# Altium PCB FULL_CB_REV_C.PcbDoc (part 2 of 2)
Units mm, origin at the board's own origin, x right, y up, seen from the top; angles counter-clockwise.
Board outline 86.1 x 38.5 mm, 4 copper layers (Top Layer, Signal Layer 2, Signal Layer 1, Bottom Layer), stack 1.643 mm thick; 96 components, 165 nets, 587 pads, 270 vias.
Unrouted connection lines stored in the file: 6.
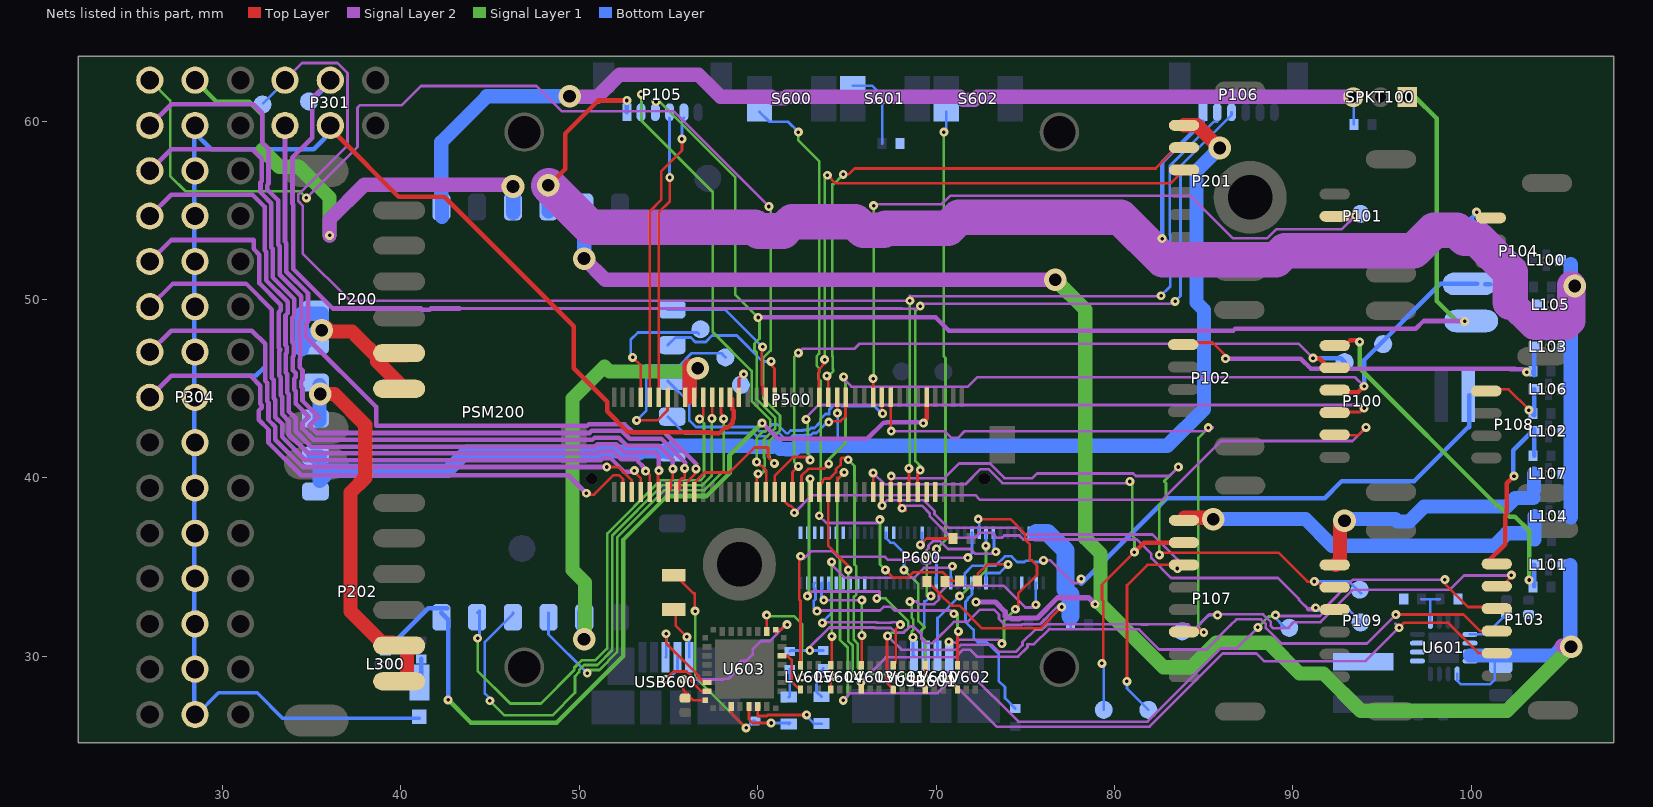
[diagram p4: the nets of this part, all layers, seen from the top]

## Via types
v1: diameter 0.5, hole 0.2, Top Layer to Bottom Layer, tented both sides, 241 vias
v2: diameter 0.5, hole 0.2, Top Layer to Bottom Layer, 15 vias
v3: diameter 1.27, hole 0.711, Top Layer to Bottom Layer, tented both sides, 14 vias

## Nets (pads, with @x,y where several pads share a name; then routed paths per layer and width w, separated by ;. In a path a pad name is that pad's centre, name@x,y a point inside that pad or via, vN(x,y) a via of type N, cw(c..) or ccw(c..) an arc to the next point about the centre after c; other vN are vias at no path point) (continued)
IO-CH2-PROT: P304.8 P500.78 | length 33
  Top Layer w0.15: v1@50.216,39.065 50.292,39.141 v1(50.394,39.141) ; v1@50.394,39.065 50.831,39.065 51.923,40.157 52.222,40.157 52.447,39.933 P500.78@52.447,39.209
  Signal Layer 2 w0.254: P304.8@25.899,44.501 27.118,45.72 31.569,45.72 32.112,45.177 32.112,44.152 32.194,44.07 32.194,43.945 32.029,43.78 32.029,43.258 32.575,42.713 32.575,41.983 34.401,40.157 49.378,40.157 v1(50.394,39.141)
IO-CH3-PROT: P304.9 P500.76 | length 34.5
  Top Layer w0.15: v1(51.537,40.615) 52.197,40.615 52.947,39.865 P500.76@52.947,39.209
  Signal Layer 2 w0.254: P304.9@25.899,47.041 27.118,48.26 31.64,48.26 32.385,47.515 32.385,45.443 32.493,45.335 32.493,44.31 32.575,44.228 32.575,43.252 32.956,42.871 32.956,42.141 34.482,40.615 v1(51.537,40.615)
IO-CH4-PROT: P304.10 P500.74 | length 37.3
  Top Layer w0.15: v1@53.061,40.361 53.447,39.975 P500.74@53.447,39.209
  Signal Layer 2 w0.254: P304.10@25.899,49.581 27.218,50.9 31.309,50.9 32.766,49.443 32.766,45.601 32.874,45.493 32.874,44.467 32.956,44.386 32.956,43.41 33.337,43.029 33.337,42.299 34.64,40.996 51.205,40.996 51.328,41.119 51.745,41.119 52.503,40.361 v1@53.061,40.361
  other v1: 53.086,40.411
IO-CH5-PROT: P304.11 P500.72 | length 40.5
  Top Layer w0.15: v1(53.721,40.386) 53.95,40.156 P500.72@53.947,39.209
  Signal Layer 2 w0.254: P304.11@25.899,52.121 27.118,53.34 31.735,53.34 31.735,52.842 32.055,52.522 32.055,50.925 33.265,49.716 33.265,49.402 33.147,49.285 33.147,47.286 33.223,47.21 33.223,47.17 33.172,47.119 33.172,45.733 33.255,45.65 33.255,44.625 33.337,44.543 33.337,43.567 33.718,43.186 33.718,42.457 34.798,41.377 51.047,41.377 51.17,41.5 51.903,41.5 52.356,41.046 53.261,41.046 53.315,40.993 53.315,40.896 53.59,40.62 53.59,40.517 v1(53.721,40.386)
IO-CH6-PROT: P304.12 P500.70 | length 43.7
  Top Layer w0.15: v1@54.412,40.386 54.412,39.244 P500.70@54.447,39.209
  Signal Layer 2 w0.254: P304.12@25.899,54.661 27.113,55.875 31.675,55.875 32.357,55.193 32.357,52.759 32.436,52.68 32.436,51.083 33.646,49.873 33.646,49.245 33.528,49.127 33.528,47.444 33.604,47.368 33.604,47.012 33.553,46.961 33.553,45.891 33.636,45.808 33.636,44.783 33.718,44.701 33.718,43.725 34.099,43.344 34.099,42.614 34.956,41.758 50.889,41.758 51.012,41.881 52.061,41.881 52.514,41.427 54.254,41.427 54.458,41.224 v1(54.458,40.411)
IO-CH7-PROT: P304.13 P500.68 | length 47.2
  Top Layer w0.15: P500.68@54.947,39.209 55.118,39.38 55.118,39.852 55.245,39.979 v1@55.245,40.557
  Signal Layer 2 w0.254: P304.13@25.899,57.201 27.118,58.42 31.655,58.42 32.194,57.881 32.194,56.645 32.126,56.577 32.126,56.01 32.738,55.398 32.738,52.916 32.817,52.838 32.817,51.241 34.027,50.031 34.027,49.087 33.909,48.969 33.909,47.602 33.985,47.525 33.985,46.854 33.934,46.804 33.934,46.049 34.099,45.884 34.099,45.654 34.017,45.572 34.017,44.941 34.099,44.859 34.099,44.171 34.831,43.439 34.48,43.088 34.48,42.772 35.113,42.139 50.731,42.139 50.854,42.262 52.219,42.262 52.672,41.808 54.447,41.808 55.245,41.01 v1(55.245,40.513)
IO-CH8-PROT: P304.14 P500.66 | length 50.3
  Top Layer w0.15: P500.66@55.447,39.209 55.618,39.38 55.618,39.852 55.736,39.97 55.844,39.97 55.905,40.031 v1(55.905,40.538)
  Signal Layer 2 w0.254: P304.14@25.899,59.741 27.118,60.96 31.715,60.96 32.233,60.442 32.233,58.801 32.575,58.459 32.575,56.487 32.507,56.419 32.507,56.168 33.119,55.556 33.119,53.074 33.198,52.995 33.198,51.399 34.408,50.189 34.408,48.929 34.29,48.811 34.29,47.759 34.366,47.683 34.366,46.697 34.315,46.646 34.315,46.206 34.48,46.042 34.48,45.496 34.398,45.414 34.398,45.099 34.48,45.017 34.48,44.329 35.4,43.409 35.339,43.409 34.861,42.93 35.271,42.52 50.574,42.52 50.697,42.643 52.377,42.643 52.83,42.189 54.605,42.189 55.931,40.863 v1@55.931,40.538
IO-SWCLK: P105.5 P500.71 | length 16.4
  Top Layer w0.152: P500.71@53.947,44.526 53.947,54.947 54.6,55.6 54.6,57.2 55.753,58.353 v1(55.753,59.004)
  Bottom Layer w0.152: v1(55.753,59.004) 55.753,60.071 P105.5@55.861,60.179
IO-SWDIO: P105.4 P500.69 | length 16.1
  Top Layer w0.152: P500.69@54.447,44.526 54.447,54.879 55.067,55.5 v1(55.067,56.845)
  Bottom Layer w0.152: P105.4@55.061,60.179 55.061,56.94 54.966,56.845 v1(55.067,56.845)
IO-USART1_RX_SPECTRUM_DSM: JP100.1 P105.3 P500.48 SPKT100.1 | length 80.6
  Top Layer w0.15: P500.48@59.947,39.209 59.947,40.16 v1(60.02,40.234)
  Signal Layer 2 w0.254: v1(60.02,48.997) 69.975,48.997 70.708,48.264 86.672,48.264 86.767,48.359 96.893,48.359 ; 96.893,48.366 97.327,48.8 v1@99.631,48.8
  Signal Layer 1 w0.15: v1@54.275,61.1 54.495,61.1 58.75,56.845 58.75,50.267 v1(60.02,48.997) ; v1(60.02,40.234) 59.995,40.259 59.995,40.005 60.353,40.363 60.353,40.664 60.396,40.707 60.396,41.081 60.353,41.124 60.353,42.151 60.978,42.776 60.978,43.38 59.949,44.409 59.949,47.031 59.822,47.158 59.822,47.533 60.096,47.807 v1@60.096,49.073
  Signal Layer 1 w0.254: SPKT100.1@96.414,61.347 96.87,61.347 98.064,60.154 98.064,49.917 99.202,48.779 v1(99.631,48.779)
  other v1: 54.3,61.1
IO-USART1_TX: P105.2 P500.46 | length 26.7
  Top Layer w0.15: v1(59.944,40.894) 60.152,40.686 60.207,40.686 60.472,40.421 60.472,39.235 P500.46@60.447,39.209
  Signal Layer 1 w0.15: v1(53.475,61.5) 53.475,60.025 57.48,56.02 57.48,48.188 59.659,46.009 59.659,44.307 60.701,43.266 60.701,42.891 60.436,42.626 60.318,42.626 59.944,42.252 v1(59.944,40.894)
  Bottom Layer w0.15: P105.2@53.5,60.65 v1@53.5,61.446
MSIC_SLP_CLK3: P600.7
NetC603_P$1: C603.P$1 U601.9 | length 2.5
  Bottom Layer w0.15: U601.9@99.936,31.236 100.84,31.236 C603.P$1@101.976,32.372
NetC604_P$1: C604.P$1 U603.1 U603.16 | length 10.8
  Top Layer w0.15: v1(55.829,28.702) 55.829,28.118 55.931,28.016 ; C604.P$1@55.931,27.654 55.931,28.016 ; U603.16@57.058,27.536 56.411,27.536 55.931,28.016 ; U603.1@61.008,31.336 U603.1@61.008,31.486 61.306,31.486 61.62,31.801 v1(61.646,31.775)
  Signal Layer 2 w0.15: v1(55.829,28.702) 58.035,28.702 58.071,28.738 58.349,28.738 58.806,29.195 58.806,29.473 59.071,29.738 59.349,29.738 59.715,30.104 59.715,30.383 60.194,30.861 60.681,30.861 61.62,31.801 v1(61.646,31.775)
NetC605_P$1: C605.P$1 L601.P$2 U603.19 | length 12.3
  Top Layer w0.15: L601.P$2@55.601,34.341 56.439,33.503 56.464,33.528 56.464,32.512 v1(56.49,32.537) ; U603.19@58.508,27.186 58.508,26.83 v1(59.35,25.988)
  Signal Layer 2 w0.254: v1(59.35,25.988) v1@59.404,25.933
  Signal Layer 1 w0.15: v1(56.49,32.537) 56.49,28.848 v1(59.35,25.988)
  Bottom Layer w0.15: v1(59.35,25.988) 59.734,26.372 C605.P$1@59.842,26.372
NetD101_C: D101.C L101.P$2 P100.1 | length 19.6
  Top Layer w0.254: P100.1@92.9,47.4 93.208,47.708 93.644,47.708 93.721,47.631 v1(93.746,47.631)
  Signal Layer 1 w0.254: v1(93.746,47.631) 93.746,46.154 101.418,38.482 ; 101.536,38.439 102.14,37.836 102.448,37.836 103.245,37.038 v1(103.245,34.279)
  Bottom Layer w0.254: D101.C@103.525,33.941 L101.P$2@103.525,35.135
NetD104_C: D104.C L103.P$2 P102.1 | length 21.7
  Top Layer w0.152: P102.1@84.026,47.595 85.493,47.595 86.225,46.863 v1(86.225,46.685)
  Signal Layer 2 w0.254: v1(86.225,46.685) 90.059,46.685 ; 90.065,46.692 90.442,46.692 91.001,46.133 102.458,46.133 ; 102.2,46.1 102.92,46.1 v1@103.098,45.922
  Bottom Layer w0.254: v1(103.11,45.935) D104.C@103.499,45.935 ; D104.C@103.525,45.757 103.525,46.951
NetD105_C: D105.C L104.P$2 P107.1 | length 22.1
  Top Layer w0.8: P107.1@83.926,37.776 85.457,37.776 v3(85.539,37.694)
  Bottom Layer w0.8: v3@85.361,37.719 85.387,37.694 v3(85.539,37.694) 90.706,37.694 92.2,36.2 101.3,36.2 102,36.9 103.548,36.9 ; D105.C@103.548,36.548 L104.P$2@103.548,37.863
NetD106_C: D106.C L105.P$2 P104.1 | length 9
  Top Layer w0.15: P104.1@100.861,54.566 101.388,54.566 P104.1@101.358,54.596
  Bottom Layer w0.254: v1(100.3,54.9) 100.3,54.8 100.241,54.8 99.986,54.545 102.818,51.713 102.818,50.164 103.644,49.338 ; 103.525,48.144 103.525,49.338
NetD107_C: D107.C L107.P$2 P109.1 | length 14.8
  Top Layer w0.8: P109.1@92.411,35.135 92.639,35.363 92.639,37.339 v3(92.9,37.6)
  Bottom Layer w0.8: v3@92.9,37.7 95.746,37.7 95.888,37.558 96.532,37.558 97.374,38.4 102,38.4 102.476,38.876 D107.C@103.474,38.876 ; 103.525,39.325 L107.P$2@103.525,40.232
NetD108_C: D108.C L106.P$2 P108.1 | length 4.7
  Top Layer w0.152: P108.1@100.861,45.041 100.932,44.969 102.094,44.969 v1@103.237,43.826
  Bottom Layer w0.254: v1(103.237,43.801) 103.525,43.514 L106.P$2@103.525,44.972
NetD300_CATHODE: D300.CATHODE D301.C L300.P$1 | length 3.4
  Bottom Layer w0.254: L300.P$1@39.132,28.753 40.814,28.753 D300.CATHODE@41.037,28.53 41.139,28.631 D301.C@41.139,29.853
NetL600_P$1: L600.1 U601.1 U601.2 U601.3
NetL601_P$1: L601.P$1 USB600.VBUS | length 2.8
  Top Layer w0.15: L601.P$1@55.397,32.461 55.397,31.725 v1(56.032,31.09)
  Bottom Layer w0.15: v1(56.032,31.09) 56.159,30.963 USB600.VBUS@56.159,29.947
NetLED600_A: LED600.A R607.P$1 | length 1.9
  Bottom Layer w0.15: LED600.A@63.576,27.737 63.3,28.013 63.3,28.942 R607.P$1@63.678,29.32
NetLED600_C: LED600.C U603.22 | length 4.3
  Top Layer w0.15: U603.22@60.008,27.186 60.008,26.657 60.511,26.657 60.57,26.716 v1(62.743,26.716)
  Bottom Layer w0.15: v1@62.705,26.678 63.158,26.225 LED600.C@63.576,26.225
NetLED601_A: LED601.A R608.P$1 | length 1.6
  Bottom Layer w0.15: LED601.A@61.747,27.711 61.798,27.762 R608.P$1@61.798,29.269
NetLED601_C: LED601.C U603.21 | length 3.2
  Top Layer w0.15: U603.21@59.508,27.186 59.508,26.471 59.715,26.264 v1(60.757,26.264)
  Bottom Layer w0.15: v1(60.757,26.264) 61.812,26.264 LED601.C@61.747,26.199
NetR600_P$1: R600.P$1 R603.P$2 U601.5 | length 2.3
  Bottom Layer w0.15: 97.218,33.204 97.708,33.204 97.711,33.207 ; U601.5@97.711,31.961 97.711,33.207 ; 98.242,33.204 97.713,33.204 97.711,33.207
NetR610_P$1: R610.P$1 R612.P$2 S600.A1 | length 36.2
  Top Layer w0.15: v1(67.158,34.849) 67.61,34.397 68.407,34.397 68.732,34.722 70.358,34.722 70.841,34.239 R612.P$2@71.323,34.239
  Signal Layer 2 w0.15: v1(63.449,37.88) 63.859,37.47 66.706,37.47 66.853,37.617 v1(66.853,37.668)
  Signal Layer 1 w0.15: v1(62.281,59.385) 62.281,58.928 63.449,57.76 63.449,46.969 63.302,46.822 63.302,46.295 63.449,46.148 63.449,45.927 63.429,45.907 63.429,45.533 63.531,45.431 63.531,37.961 v1(63.449,37.88) ; v1(66.853,37.668) 66.853,35.158 67.158,34.853 v1(67.158,34.849)
  Bottom Layer w0.15: S600.A1@60.1,60.528 60.659,59.969 61.697,59.969 v1(62.281,59.385)
NetR611_P$1: R611.P$1 S601.B3 | length 4.6
  Bottom Layer w0.15: S601.B3@65.332,61.99 66.407,61.99 66.988,61.409 66.988,58.75
NetU603_14: U603.14 USB600.D+ | length 5.1
  Top Layer w0.15: v1(54.864,31.267) 54.864,30.734 56.706,28.892 56.706,28.803 56.973,28.536 U603.14@57.158,28.536
  Bottom Layer w0.15: USB600.D+@54.839,29.947 54.864,29.972 v1(54.864,31.267)
NetU603_15: U603.15 USB600.D- | length 4.7
  Top Layer w0.15: v1(54.839,28.702) 55.291,29.154 56.016,29.154 56.281,28.889 56.281,28.6 56.845,28.036 U603.15@57.158,28.036
  Bottom Layer w0.15: v1(54.839,28.702) 54.959,28.702 55.499,29.242 USB600.D-@55.499,29.947
OSC_CLK_OUT_0: P600.67
OTG_DM1: P201.3 P500.33 | length 33.3
  Top Layer w0.15: P500.33@63.449,44.526 63.429,44.546 63.429,46.081 63.754,46.406 v1(63.754,46.634) ; v1(63.906,56.972) 64.364,56.515 83.147,56.515 P201.3@83.9,57.267
  Signal Layer 1 w0.15: v1(63.754,46.634) 63.754,56.944 63.726,56.972 v1(63.906,56.972)
OTG_DP1: P201.2 P500.31 | length 32.9
  Top Layer w0.15: v1(63.881,45.72) 63.83,45.72 63.779,45.669 63.957,45.491 P500.31@63.957,44.526 ; v1(64.795,57.023) 65.1,57.023 65.43,57.353 82.313,57.353 83.477,58.517 P201.2@83.9,58.517
  Signal Layer 1 w0.15: v1(63.881,45.72) 63.957,45.72 64.237,45.999 64.237,46.076 64.206,46.106 64.206,46.822 64.186,46.842 64.186,56.464 64.237,56.464 v1(64.795,57.023)
PERIPH_5V: D103.C L102.P$2 P103.1 | length 10.1
  Top Layer w0.254: P103.1@100.861,35.242 101.9,36.281 101.9,37.892 102,37.992 102,39.7 v1(102.4,40.1)
  Bottom Layer w0.254: v1@102.374,40.1 102.374,40.126 102.348,40.152 102.348,41.548 103.525,42.725 D103.C@103.525,41.246
PPM-SBUS-PROT: P304.15 P500.62 | length 68.6
  Top Layer w0.15: P500.62@56.447,39.209 56.447,39.733 57.023,40.31 58.426,40.31 59.823,41.707 60.578,41.707 60.578,41.175 v1(60.935,40.818)
  Signal Layer 2 w0.15: v1(34.7,55.7) 37.564,58.564 37.564,60.754 37.712,60.902 40.053,60.902 41.127,61.976 47.6,61.976 49.022,60.554 55.296,60.554 v1(60.63,55.22) v1@60.63,55.27
  Signal Layer 1 w0.15: P304.15@25.92,62.3 27.062,61.158 27.062,56.923 27.906,56.078 34.322,56.078 v1(34.7,55.7) ; v1(60.63,55.22) 60.726,55.123 60.726,47.141 60.305,46.72 60.305,44.445 61.255,43.495 61.255,42.662 60.63,42.037 60.63,41.239 60.673,41.196 60.673,41.079 v1(60.935,40.818)
PRESSURE_SENS_IN: ADC_PR.P$1 P101.2 P500.21 | length 40.2
  Top Layer w0.15: P500.21@66.472,44.526 v1(66.472,45.568) ; P101.2@92.8,54.7 v1@93.37,54.7
  Signal Layer 2 w0.15: v1(66.497,55.27) 66.497,55.296 66.446,55.347 70.318,55.347 70.788,55.817 84.266,55.817 86.653,53.431 88.556,53.431 89.065,53.939 92.739,53.939 v1(93.5,54.7)
  Signal Layer 1 w0.15: v1(66.472,45.568) 66.497,45.593 v1(66.497,55.27)
PROT_SPARE_1: P500.8
PROT_SPARE_2: P500.10
PSW: P600.21 R606.P$2 | length 8.7
  Bottom Layer w0.15: P600.21@72.013,34.11 72.013,33.473 71.775,33.235 71.775,33.182 71.653,33.06 71.653,31.929 72.076,31.506 72.105,31.477 72.105,31.019 72.353,30.771 ; 72.339,30.785 72.847,30.785 73.279,30.353 73.284,30.358 73.511,30.131 73.511,28.622 73.863,28.27 73.863,27.653 R606.P$2@74.439,27.076
PWRBTN#: P600.17 R612.P$1 | length 4.3
  Top Layer w0.15: R612.P$1@72.331,34.239 72.331,34.612 72.873,35.154 v1(74.041,35.154)
  Bottom Layer w0.15: P600.17@72.8,34.11 72.8,34.675 73.562,34.675 v1(74.041,35.154)
RCVR_MODE: P600.31 S602.A1 | length 26.7
  Signal Layer 1 w0.15: v1(70.028,36.017) 70.531,36.52 70.531,46.72 70.434,46.816 v1(70.434,59.385)
  Bottom Layer w0.15: P600.31@70.006,34.11 70.028,34.131 v1(70.028,36.017) ; v1(70.434,59.385) 70.565,59.516 S602.A1@70.565,60.528
RESET_OUT#: P600.36 R613.P$2 | length 2.7
  Top Layer w0.15: v1(69.124,36.252) 69.473,36.601 R613.P$2@70.942,36.601
  Bottom Layer w0.15: v1(69.124,36.252) 69.219,36.348 P600.36@69.219,36.932
RX_5V0_OUT: "P304.RX 5V" PSM200.RX | length 27
  Signal Layer 2 w0.8: v1(36,53.6) 36,54.491 37.948,56.439 46.177,56.439 v3(46.279,56.337)
  Signal Layer 1 w0.254: 28.46,62.3 29.66,61.1 31.5,61.1 32.233,60.367 32.233,58.395
  Signal Layer 1 w0.8: 32.233,58.395 33.174,57.453 34.267,57.453 36,55.719 v1(36,53.6)
  Bottom Layer w0.8: PSM200.RX@46.3,54.875 v3@46.3,56.337
S.BUS_OUT: P301.1 P500.64 | length 39.8
  Top Layer w0.15: P500.64@55.947,39.209 55.947,39.681 56.54,40.274 v1(56.54,40.513)
  Signal Layer 2 w0.254: P301.1@33.5,59.76 33.5,53.232 33.579,53.153 33.579,51.557 34.789,50.347 34.789,48.771 34.671,48.654 34.671,47.917 38.608,43.98 38.608,42.926 50.441,42.926 50.539,43.024 52.534,43.024 52.988,42.57 54.762,42.57 56.54,40.792 v1(56.54,40.513)
SAFETY: P107.6 P500.17 | length 33.9
  Top Layer w0.15: P500.17@67.462,44.526 67.462,42.647 67.437,42.621 v1(67.488,42.621) ; P107.6@83.926,31.521 83.951,31.496 85.006,31.496 v1(85.006,31.344)
  Signal Layer 2 w0.15: v1(67.488,42.621) 70.481,42.621 70.857,42.245 71.231,42.245 71.607,42.621 85.056,42.621 v1(85.26,42.824) 85.514,42.824 v1@85.31,42.621
  Signal Layer 1 w0.15: v1(85.006,31.344) 85.006,31.496 84.929,31.42 84.702,31.647 84.702,42.241 85.285,42.824 v1(85.26,42.824)
SD_0_CD#: P600.60
SD_0_CLK: P600.58
SD_0_CLK_FB: P600.44
SD_0_CMD: P600.62
SD_0_DAT0: P600.66
SD_0_DAT1: P600.70
SD_0_DAT2: P600.64
SD_0_DAT3: P600.68
SERIAL1_CTS: P100.4 P500.44 | length 38.8
  Top Layer w0.15: P500.44@60.947,39.209 60.947,40.119 62.001,41.173 62.763,41.173 v1(62.941,40.996) ; P100.4@92.4,43.7 93.777,43.7 v1(94,43.923)
  Signal Layer 2 w0.15: v1(62.713,43.282) 62.713,43.383 63.419,44.089 v1@93.834,44.089
  Signal Layer 1 w0.15: v1(62.713,43.282) 62.812,43.182 62.812,41.358 v1@62.969,41.201
SERIAL1_RTS: P100.5 P500.42 | length 37.4
  Top Layer w0.15: P500.42@61.447,39.209 61.447,38.742 61.74,38.448 61.831,38.448 62.052,38.227 v1(62.052,38.049) ; P100.5@92.607,42.507 92.715,42.4 93.671,42.4 v1(94.102,42.831)
  Signal Layer 2 w0.15: v1(62.052,38.049) 63.035,39.032 72.199,39.032 72.445,38.786 82.694,38.786 85.976,42.067 92.961,42.067 ; 92.967,42.074 93.344,42.074 v1(94.102,42.831)
SERIAL1_RX: JP100.2 P100.3 P500.38 S1RX.P$1 | length 49.5
  Top Layer w0.15: P500.38@62.459,39.209 62.459,40.132 62.84,40.513 63.703,40.513 v1(63.983,40.792)
  Top Layer w0.254: P100.3@92.6,44.8 93.658,44.8 v1(94,45.142)
  Signal Layer 2 w0.15: v1(64.821,45.669) 64.795,45.644 64.795,45.568 65.247,45.116 71.781,45.116 72.304,45.639 91.013,45.639 ; 91.02,45.645 93.497,45.645 v1(94,45.142)
  Signal Layer 1 w0.15: v1(63.983,40.792) 63.983,41.026 64.917,41.96 64.917,45.573 v1(64.821,45.669)
  Bottom Layer w0.254: v1@93.873,45.193 93.924,45.142 v1(94,45.142) 94,46.615 98.267,50.883 JP100.2@100.35,50.883 ; JP100.2@100.799,50.862 JP100.2@101.078,50.862
SERIAL1_TX: P100.2 P500.40 S1TX.P$1 | length 41.3
  Top Layer w0.15: P500.40@61.951,39.209 61.951,40.322 v1(62.281,40.653) v1@62.281,40.742
  Top Layer w0.254: v1(91.13,46.717) 91.483,46.717 92.1,46.1 P100.2@92.7,46.1
  Signal Layer 2 w0.15: v1(62.281,47.015) 62.509,47.244 65.43,47.244 65.71,47.523 87.833,47.523 ; 87.84,47.53 90.317,47.53 v1(91.13,46.717)
  Signal Layer 1 w0.15: v1(62.281,40.653) 62.057,40.876 62.057,46.792 v1(62.281,47.015) v1@62.306,47.015
  Bottom Layer w0.254: v1(91.13,46.717) 92.679,46.717 S1TX.P$1@92.908,46.488
SERIAL2_CTS: LV603.4 P103.4 P500.32 | length 52
  Top Layer w0.15: P500.32@63.957,39.209 63.957,36.195 65.075,35.077 v1(65.075,34.849) ; v1(65.786,28.55) 65.8,28.536 LV603.4@65.8,28.15 ; v1(95.778,32.341) 99.571,32.341 100.492,31.42 P103.4@101.433,31.42
  Signal Layer 2 w0.15: v1(65.786,28.55) 67.183,29.947 71.09,29.947 71.517,30.373 71.891,30.373 72.285,29.98 74.597,29.98 75.126,30.508 75.126,30.684 75.493,30.684 76.321,31.513 81.375,31.513 82.504,30.384 85.153,30.384 86.518,31.748 86.518,31.759 86.833,32.075 88.224,32.075 88.488,31.81 88.488,31.584 89.352,30.72 94.158,30.72 v1(95.778,32.341)
  Signal Layer 1 w0.15: v1(65.075,34.849) 65.075,30.851 65.329,30.596 65.329,29.007 v1(65.786,28.55)
SERIAL2_RTS: LV602.4 P103.5 P500.30 | length 57.2
  Top Layer w0.15: P500.30@64.465,39.209 64.465,40.005 64.541,40.005 v1(64.846,40.31) ; v1(70.807,28.652) 70.807,28.543 LV602.4@71.2,28.15 ; v1(95.956,31.604) 96.235,31.883 98.703,31.883 100.411,30.175 P103.5@101.433,30.175
  Signal Layer 2 w0.15: v1(64.795,27.534) 65.197,27.935 70.09,27.935 v1(70.807,28.652) 73.398,26.06 81.96,26.06 86.061,30.161 87.964,30.161 88.395,29.73 94.081,29.73 v1(95.956,31.604) 95.969,31.617 95.753,31.833
  Signal Layer 1 w0.15: v1(64.795,27.534) 65.052,27.79 65.052,30.482 64.612,30.921 64.612,35.468 64.465,35.615 64.465,39.954 64.491,39.954 v1(64.846,40.31)
SERIAL2_RX: LV600.4 P103.3 P500.34 S2RX.P$1 | length 59.3
  Top Layer w0.15: P500.34@63.449,39.209 63.449,39.573 63.628,39.752 63.628,39.852 63.747,39.97 64.038,39.97 64.394,40.326 64.394,40.497 64.658,40.761 64.658,41.061 64.719,41.123 64.973,41.123 v1(65.075,41.021) ; v1(68.504,28.778) 68.885,28.778 68.936,28.829 68.941,28.824 68.941,28.591 69.382,28.15 LV600.4@69.4,28.15 ; v1@98.394,34.195 99.827,32.762 P103.3@101.433,32.762
  Signal Layer 2 w0.15: v1(68.504,28.778) 68.956,28.326 69.842,28.326 70.619,29.104 71.849,29.104 74.613,26.34 81.848,26.34 85.946,30.438 86.851,30.438 v1(88.036,31.623) ; v1@89.171,32.258 91.509,32.258 ; 91.515,32.264 91.734,32.484 91.734,32.647 93.384,34.296 v1(98.521,34.296)
  Signal Layer 1 w0.15: v1(65.075,41.021) 65.425,40.671 65.425,35.138 65.527,35.036 65.527,33.476 65.385,33.334 65.385,30.932 65.606,30.711 65.606,29.365 65.969,29.002 68.28,29.002 v1(68.504,28.778) ; v1(88.036,31.623) 88.646,32.233 88.951,32.233 v1(89.027,32.309)
  Bottom Layer w0.15: v1(89.027,32.309) 89.002,32.283 88.993,32.283 88.943,32.233 89.575,31.6 S2RX.P$1@89.8,31.6
SERIAL2_TX: LV601.4 P103.2 P500.36 S2TX.P$1 | length 60.9
  Top Layer w0.15: v1(67.285,31.14) 67.248,31.104 67.248,28.502 LV601.4@67.6,28.15 ; P103.2@100.861,33.992 101.785,33.992 v1@102.289,34.496
  Signal Layer 2 w0.15: v1(62.789,33.376) 63.043,33.63 66.827,33.63 66.827,33.401 v1(66.675,33.249) ; v1(67.285,31.14) 68.052,30.373 70.511,30.373 70.526,30.358 70.901,30.358 70.916,30.373 71.125,30.373 71.402,30.65 73.105,30.65 73.498,30.257 74.482,30.257 74.849,30.623 74.849,30.799 75.534,31.484 75.901,31.484 76.207,31.79 81.49,31.79 81.499,31.781 81.874,31.781 81.883,31.79 84.127,31.79 84.447,31.471 85.328,32.352 88.338,32.352 88.765,31.925 88.765,31.699 88.892,31.572 89.705,31.572 90.042,31.91 90.42,31.91 ; 90.426,31.916 91.559,31.916 93.38,33.738 98.801,33.738 99.613,34.55 ; 99.613,34.53 v1@102.255,34.53
  Signal Layer 1 w0.15: v1(62.789,33.376) 62.789,33.419 62.873,33.503 v1@62.873,39.954 ; v1(66.675,33.249) 67.162,33.249 68.448,31.963 68.448,31.588 68.183,31.323 67.468,31.323 v1(67.285,31.14)
  Bottom Layer w0.15: S2TX.P$1@83.8,31.4 84.376,31.4 85.285,32.309 v1(85.776,32.309)
  other v1: 102.255,34.55 62.941,39.954
SERIAL3_RX: P107.3 P500.20 S3RX.P$1 | length 30
  Top Layer w0.15: v1(80.7,28.6) 80.7,33.976 81.849,35.125 P107.3@83.775,35.125 ; P107.3@83.9,35.125 P107.3@83.775,35.125 ; P107.3@83.926,35.276 P107.3@83.775,35.125
  Signal Layer 2 w0.15: v1(66.98,38.456) 67.279,38.755 69.297,38.755 69.916,38.136 69.916,37.974 70.689,37.201 74.625,37.201 74.996,36.83 82.136,36.83 83.532,35.434 v1(83.532,34.925)
  Bottom Layer w0.15: v1(80.7,28.6) 80.7,28.2 S3RX.P$1@81.9,27
SERIAL3_TX: P107.2 P500.22 S3TX.P$1 | length 33.5
  Top Layer w0.15: P500.22@66.472,39.209 66.472,40.259 66.446,40.284 v1(66.472,40.284) ; v1(79.3,29.6) 79.37,29.67 79.37,33.106 79.3,33.176 79.3,34.02 v1(81.119,35.839) ; P107.2@83.9,36.526 P107.2@83.926,36.526
  Top Layer w0.254: v1(81.119,35.839) 81.655,36.375 P107.2@83.9,36.375
  Signal Layer 2 w0.15: v1@66.421,40.284 v1(66.472,40.284) 67.102,39.655 71.663,39.655 72.5,40.491 72.941,40.491 73.724,39.708 80.771,39.708 v1(80.865,39.802)
  Signal Layer 1 w0.15: v1(80.865,39.802) 80.942,39.878 80.992,39.878 80.992,36.764 81.119,36.637 v1(81.119,35.839)
  Bottom Layer w0.15: v1(79.3,29.6) 79.4,29.5 S3TX.P$1@79.4,27
SERIAL4_RX: P109.3 P500.16 S4RX.P$1 | length 32.3
  Top Layer w0.15: P500.16@67.97,39.209 67.97,38.506 68.301,38.176 68.224,38.176 v1(68.097,38.303) ; P109.3@92.411,32.635 91.368,32.635 v1(91.282,32.722) ; v1(91.282,32.722) 91.282,32.671 91.257,32.645 91.257,32.696 v1(91.282,32.722)
  Signal Layer 2 w0.15: v1(68.097,38.303) 68.242,38.448 69.212,38.448 69.639,38.021 69.639,37.859 70.851,36.647 72.171,36.647 72.448,36.924 73.098,36.924 73.375,36.647 73.701,36.647 73.828,36.774 74.66,36.774 74.889,36.545 81.252,36.545 82.064,35.733 82.064,35.5 83.173,34.392 89.158,34.392 90.343,33.207 90.343,33.169 90.873,32.639 ; v1@91.257,32.645 91.282,32.671 v1(91.282,32.722)
  Signal Layer 2 w0.254: 90.873,32.639 v1@91.2,32.639
  Bottom Layer w0.15: v1(91.282,32.722) 91.282,32.671 91.181,32.569 93.187,32.569 S4RX.P$1@93.949,31.807
SERIAL4_TX: P109.2 P500.18 S4TX.P$1 | length 37.3
  Top Layer w0.15: P500.18@67.462,39.209 67.462,40.081 v1(67.488,40.107) ; v1(82.516,35.687) 82.643,35.814 89.197,35.814 90.822,34.188 v1@91.2,34.188 ; v1@91.282,34.271 91.668,33.885 P109.2@92.411,33.885
  Signal Layer 2 w0.15: v1(67.488,40.107) 67.61,39.985 70.461,39.985 71.288,40.813 73.011,40.813 73.839,39.985 75.397,39.985 75.666,40.254 81.053,40.254 81.2,40.107 83.075,40.107 v1(83.583,40.615)
  Signal Layer 1 w0.15: v1(82.516,35.687) 82.516,38.506 82.887,38.877 82.887,39.71 82.783,39.815 v1(83.583,40.615)
  Bottom Layer w0.15: v1@91.13,34.271 v1(91.206,34.195) 93.162,34.195 S4TX.P$1@93.822,33.534
SERIAL5_RX: P106.3 P301.4 P500.12 S5_RX.P$1 | length 86.5
  Top Layer w0.15: P500.12@68.961,39.209 68.961,40.284 v1(69.113,40.437)
  Signal Layer 2 w0.15: 43.3,49.5 68.1,49.5 68.116,49.484 68.966,49.484 v1(69.113,49.632) 69.24,49.759 v1@83.4,49.759
  Signal Layer 2 w0.254: P301.4@36.04,62.3 35.024,61.284 35.024,59.078 33.919,57.973 33.919,55.377 33.96,55.336 33.96,51.714 36.174,49.5 41.124,49.5 41.191,49.432 41.609,49.432 41.676,49.5 43.3,49.5
  Signal Layer 1 w0.15: v1(69.113,40.437) 69.113,40.665 68.839,40.94 68.839,49.357 v1(69.113,49.632)
  Bottom Layer w0.15: S5_RX.P$1@35.001,61.087 P301.4@36.316,62.402 ; v1(83.4,49.9) 83.7,50.2 83.7,57.485 86.561,60.347 P106.3@86.561,60.5
SERIAL5_TX: P106.2 P301.2 P500.14 S5_TX.P$1 | length 88.6
  Top Layer w0.15: P500.14@68.453,39.209 68.478,39.235 v1(68.478,40.538)
  Signal Layer 2 w0.15: P301.2@33.5,62.3 34.464,63.264 36.439,63.264 37.004,62.699 37.004,58.643 34.248,55.887 34.248,55.513 34.493,55.268 34.493,52.578 37.135,49.936 v1(68.529,49.936) 68.529,50.216 68.555,50.19 v1@82.593,50.19
  Signal Layer 1 w0.15: v1@68.529,40.513 v1(68.529,49.936)
  Bottom Layer w0.15: S5_TX.P$1@32.283,61.011 P301.2@33.471,62.198 ; v1(82.618,50.216) 83.121,50.719 83.121,53.603 83.1,53.624 83.1,57.5 85.576,59.976 85.761,59.976
SPI_2_CLK: P600.55
SPI_2_FS0: P600.53
SPI_2_FS1: P600.51
SPI_2_RXD: P600.59
SPI_2_TXD: P600.57
SPI_EXT_MISO: P500.67 SPI_MISO1.P$1 | length 10.8
  Top Layer w0.152: v1(53.213,43.231) 54.381,43.231 54.947,43.796 P500.67@54.947,44.526
  Bottom Layer w0.152: v1(53.213,43.231) 53.746,43.764 53.746,46.304 55.609,46.304 56.295,46.99 57.963,46.99 SPI_MISO1.P$1@58.191,46.761
SPI_EXT_MOSI: P500.51 SPI_MOSI1.P$1 | length 1.4
  Top Layer w0.152: P500.51@58.947,44.526 58.947,45.535 59.207,45.796 v1(59.207,45.822)
SPI_EXT_SCK: P500.73 SPI_SCK1.P$1 | length 7.6
  Top Layer w0.15: v1(52.984,46.761) 53.447,46.299 P500.73@53.447,44.526
  Bottom Layer w0.15: v1(52.984,46.761) 52.959,46.736 52.883,46.736 52.883,47.752 53.283,48.152 56.611,48.152 SPI_SCK1.P$1@56.699,48.064
UART_1_CTS: LV602.3 P600.65 | length 13.4
  Top Layer w0.15: v1(63.325,32.537) v1@63.325,32.662 ; LV602.3@71.196,29.504 71.196,31.217 71.247,31.267 v1(71.247,31.394)
  Signal Layer 2 w0.15: v1(63.325,32.537) 63.444,32.418 63.59,32.564 66.85,32.564 67.072,32.786 67.446,32.786 67.668,32.564 70.814,32.564 v1(70.993,32.385)
  Signal Layer 1 w0.15: v1(70.993,32.385) 71.145,32.385 71.196,32.334 71.196,31.217 71.247,31.267 v1(71.247,31.394)
  Bottom Layer w0.15: P600.65@63.197,34.11 63.15,34.063 63.15,33.865 63.241,33.774 63.241,33.188 63.15,33.097 63.15,32.712 v1(63.325,32.537)
UART_1_RTS: LV603.3 P600.63 | length 6.9
  Top Layer w0.15: LV603.3@65.8,29.5 65.837,29.537 v1(65.837,31.166)
  Signal Layer 2 w0.15: v1(63.703,33.147) v1(65.837,33.147)
  Signal Layer 1 w0.15: v1(65.837,31.166) v1(65.837,33.147)
  Bottom Layer w0.15: P600.63@63.596,34.11 63.579,34.092 63.579,33.17 63.602,33.147 v1(63.703,33.147)
UART_1_RX: LV601.3 P600.61 | length 9.5
  Top Layer w0.15: LV601.3@67.6,29.5 67.737,29.637 67.737,31.516 v1(67.996,31.775)
  Signal Layer 2 w0.15: v1(63.627,31.877) 63.602,31.902 66.671,31.902 66.691,31.882 67.472,31.882 67.492,31.902 67.869,31.902 v1(67.996,31.775)
  Bottom Layer w0.15: v1(63.627,31.877) 63.602,31.902 64.155,32.456 64.155,33.603 63.996,33.762 P600.61@63.996,34.11
UART_1_TX: LV600.3 P600.46 | length 10
  Top Layer w0.15: v1(69.393,28.778) 69.4,28.785 LV600.3@69.4,29.5
  Signal Layer 1 w0.15: v1(68.199,34.849) 69.002,34.046 69.002,31.98 69.348,31.634 69.169,31.455 69.169,31.08 69.393,30.857 v1(69.393,28.778)
  Bottom Layer w0.15: P600.46@67.212,36.932 67.212,36.595 67.434,36.374 67.618,36.374 68.199,35.793 v1(68.199,34.849)
UART_2_RX: LV605.3 P600.22 | length 17.8
  Top Layer w0.15: LV605.3@62.4,29.5 62.4,33.125 62.337,33.188 62.337,35.54 v1(62.408,35.611) ; v1@71.704,35.458 v1(71.78,35.535)
  Signal Layer 2 w0.15: v1(62.408,35.611) 62.555,35.464 62.976,35.885 64.195,35.885 64.502,35.578 67.136,35.578 67.306,35.408 69.109,35.408 69.282,35.235 69.656,35.235 69.921,35.5 69.921,35.532 70.758,35.532 70.76,35.535 v1(71.78,35.535)
  Bottom Layer w0.15: v1(71.78,35.535) 72.013,35.767 P600.22@72.013,36.932
UART_2_RX_OUT: LV605.4 U603.30 | length 2.5
  Top Layer w0.15: U603.30@61.358,30.036 61.7,30.036 61.7,30 61.9,29.8 61.9,28.6 LV605.4@62.35,28.15
UART_2_TX: LV604.3 P600.27 | length 14.4
  Top Layer w0.15: LV604.3@64.1,29.5 64.148,29.548 64.148,31.128 v1(64.16,31.115)
  Signal Layer 2 w0.15: v1@64.156,35.301 v1(64.148,35.293) 64.148,35.136 64.888,34.397 68.763,34.397 69.324,34.958 70.823,34.958 v1(70.917,35.052)
  Signal Layer 1 w0.15: v1(64.148,35.293) 64.155,35.286 64.155,31.135 64.148,31.128 v1(64.16,31.115)
  Bottom Layer w0.15: P600.27@70.819,34.11 70.819,34.954 v1(70.917,35.052)
UART_2_TX_OUT: LV604.4 U603.2 | length 8.7
  Top Layer w0.15: v1(60.503,32.309) 60.503,31.392 U603.2@60.508,31.386 ; LV604.4@64.1,28.15 64.1,28.642 v1(64.313,28.854)
  Signal Layer 2 w0.15: v1(62.484,28.829) 62.509,28.854 v1(64.313,28.854)
  Signal Layer 1 w0.15: v1@60.503,32.253 62.032,32.253 62.484,31.801 62.484,30.535 62.464,30.515 62.464,28.849 v1(62.484,28.829)
USB_DN: P600.18 USB601.D- | length 8.1
  Signal Layer 1 w0.15: v1(71.323,33.376) 71.378,33.43 71.422,33.43 72.796,34.804 v1(72.796,36.195)
  Bottom Layer w0.15: USB601.D-@70.079,30.023 70.079,32.156 70.104,32.156 v1(71.323,33.376) ; v1(72.796,36.195) 72.8,36.199 P600.18@72.8,36.932
USB_DP: P600.16 USB601.D+ | length 12.2
  Signal Layer 2 w0.15: v1(69.469,35.687) 69.469,35.958 69.576,36.065 69.576,36.204 69.841,36.469 70.215,36.469 70.667,36.017 71.937,36.017 72.211,35.743 73.233,35.743 v1(73.355,35.865)
  Signal Layer 1 w0.15: v1(69.469,35.687) 69.469,33.401 69.492,33.377 v1(69.71,33.377)
  Bottom Layer w0.15: 69.342,32.868 69.34,32.869 69.34,33.096 69.429,33.096 v1(69.71,33.377) ; 69.342,32.869 69.342,31.627 69.169,31.455 69.169,31.08 69.342,30.908 69.342,30.099 USB601.D+@69.418,30.023 ; P600.16@73.207,36.932 73.248,36.89 73.248,35.972 v1(73.355,35.865)
USB_ID: P600.3 USB601.ID | length 12.9
  Signal Layer 2 w0.15: v1(68.529,33.071) 68.656,33.071 68.676,33.091 68.86,33.091 69.028,32.924 69.896,32.924 70.162,33.19 70.162,33.485 70.637,33.96 73.783,33.96 75.002,32.741 v1@75.59,32.741
  Signal Layer 1 w0.15: v1(68.529,33.071) 68.656,33.071 68.633,33.048 68.633,32.169 68.725,32.077 68.725,31.473 68.633,31.382 68.633,31.189 68.707,31.115 v1(68.707,31.064)
  Bottom Layer w0.15: v1(68.707,31.064) 68.707,30.084 USB601.ID@68.768,30.023 ; v1@75.59,32.741 75.59,34.081 P600.3@75.62,34.11
  other v1: 75.59,32.893
USB_VBUS: P600.20 USB601.VBUS | length 14.3
  Top Layer w0.15: v1(72.365,37.694) 74.168,37.694 74.997,36.865 74.997,36.539 75.255,36.281 75.255,35.352 ; v1(74.447,32.639) 74.625,32.817 74.605,32.837 74.605,33.512 75.661,34.568 75.661,35.087 75.397,35.352 75.26,35.352
  Signal Layer 2 w0.15: v1(70.714,30.81) 70.716,30.81 70.761,30.765 71.125,30.765 71.288,30.927 73.523,30.927 v1@73.685,30.765
  Signal Layer 1 w0.15: v1(73.685,30.709) 73.805,30.828 73.805,31.996 v1(74.447,32.639)
  Bottom Layer w0.15: v1@72.317,37.741 v1(72.365,37.694) 72.419,37.639 P600.20@72.419,36.932
V\B\U\S\_\V\A\L\I\D\: P500.59 PSM200.!VBUS_VALID | length 30.8
  Top Layer w0.15: v1@56.82,43.307 56.947,43.434 P500.59@56.947,44.526
  Signal Layer 1 w0.15: v1(44.298,31.013) 44.298,29.185 46.126,27.356 47.843,27.356 49.715,29.228 49.715,29.36 50.142,29.787 50.894,29.787 51.568,30.461 51.568,36.891 54.549,39.872 56.784,39.872 56.992,40.08 56.992,43.058 v1(56.744,43.307)
  Bottom Layer w0.15: PSM200.!VBUS_VALID@44.272,32.436 44.399,32.563 v1@44.399,30.937
V\D\D\_\5\V\_\H\I\P\O\W\E\R\_\O\C\: P500.45 PSM200.!VDD_5V_HIPOWER_OC | length 9.2
  Top Layer w0.152: v1(60.274,47.346) 60.401,47.219 60.223,47.041 60.223,45.223 60.277,45.169 60.277,44.696 P500.45@60.447,44.526
  Bottom Layer w0.152: PSM200.!VDD_5V_HIPOWER_OC@54.958,49.442 58.178,49.442 v1(60.274,47.346)
V\D\D\_\5\V\_\P\E\R\I\P\H\_\E\N\: P500.27 PSM200.!VDD_5V_PERIPH_EN | length 12.2
  Top Layer w0.152: v1(63.983,43.129) 64.037,43.184 64.653,43.184 64.918,43.449 64.918,44.497 P500.27@64.948,44.526
  Bottom Layer w0.152: PSM200.!VDD_5V_PERIPH_EN@54.958,43.434 55.872,42.52 59.772,42.52 59.945,42.346 60.552,42.346 60.726,42.52 61.2,42.52 61.496,42.223 61.811,42.223 61.963,42.376 62.636,42.376 62.672,42.412 62.994,42.412 63.102,42.52 63.297,42.52 63.729,42.951 63.729,42.977 63.83,42.977 v1(63.983,43.129)
V\D\D\_\5\V\_\P\E\R\I\P\H\_\O\C\: P500.43 PSM200.!VDD_5V_PERIPH_OC | length 8.9
  Top Layer w0.152: v1(60.757,46.533) 60.757,46.33 60.947,46.14 P500.43@60.947,44.526
  Bottom Layer w0.152: PSM200.!VDD_5V_PERIPH_OC@54.958,47.442 55.39,47.874 56.251,47.874 56.5,47.625 57.089,47.625 57.445,47.981 58.826,47.981 60.274,46.533 v1(60.757,46.533)
V\D\D\_\B\A\C\K\U\P\_\V\A\L\I\D\: P500.57 PSM200.!VDD_BACKUP_VALID | length 32.8
  Top Layer w0.15: v1@57.404,43.332 57.447,43.375 P500.57@57.447,44.526
  Signal Layer 1 w0.15: v1(44.983,27.508) 45.796,26.695 48.489,26.695 49.759,27.965 49.759,28.879 49.992,29.113 49.992,29.245 50.257,29.51 51.009,29.51 51.845,30.346 51.845,36.776 54.664,39.595 56.899,39.595 57.429,40.125 v1(57.429,43.332)
  Bottom Layer w0.15: v1@45.047,27.572 44.704,27.915 44.704,30.81 46.279,32.385 46.279,32.439 PSM200.!VDD_BACKUP_VALID@46.276,32.436
V\D\D\_\B\R\I\C\K\_\V\A\L\I\D\: P500.55 PSM200.!VDD_BRICK_VALID | length 24.8
  Top Layer w0.15: P500.55@57.947,44.526 57.947,43.603 58.115,43.434 57.988,43.307 v1@57.988,43.18
  Signal Layer 1 w0.15: v1(50.444,29.058) 50.619,29.233 51.123,29.233 52.122,30.231 52.122,36.661 54.779,39.318 57.014,39.318 58.09,40.394 v1(58.09,43.307)
  Bottom Layer w0.15: PSM200.!VDD_BRICK_VALID@48.275,32.436 48.275,31.227 v1(50.444,29.058)
V_VBAT_BKUP: BATT600.1 P600.23 | length 35.6
  Signal Layer 2 w0.15: v1(76.022,35.382) 76.403,35.382 77.673,34.112 v1@78.13,34.112
  Bottom Layer w0.15: P600.23@71.607,34.11 71.607,34.65 72.04,35.083 73.331,35.083 73.854,35.606 74.228,35.606 74.546,35.288 74.959,35.288 75.022,35.352 75.397,35.352 75.46,35.288 75.928,35.288 v1(76.022,35.382)
  Bottom Layer w0.254: v1(78.13,34.341) 78.13,34.07 82.923,38.862 91.778,38.862 91.781,38.859 92.73,39.808 96.796,39.808 99.842,42.855 ; 99.891,42.834 BATT600.1@99.891,44.639
VBUS: P201.1 P500.29 PSM200.VBUS PSM200.VDD_VBUS | length 73.9
  Top Layer w0.15: P500.29@64.465,44.526 v1(64.465,43.637) v1@64.491,43.612
  Top Layer w0.8: P201.1@83.9,59.767 84.624,59.767 v3(85.895,58.496)
  Bottom Layer w0.15: 64.491,41.808 v1@64.491,43.612
  Bottom Layer w0.8: PSM200.VDD_VBUS@35.103,41.199 35.449,41.199 35.449,39.843 36.017,40.411 42.621,40.411 43.688,41.478 52.546,41.478 52.612,41.412 53.408,41.412 53.474,41.478 54.907,41.478 54.958,41.427 55.339,41.808 59.63,41.808 59.695,41.743 60.802,41.743 60.868,41.808 61.058,41.808 61.246,41.62 61.612,41.62 61.621,41.612 62.052,41.612 62.213,41.773 62.886,41.773 62.922,41.808 80.874,41.808 ; 80.8,41.8 82.965,41.8 85.02,43.855 85.02,49.418 84.6,49.838 84.6,57.202 v3(85.895,58.496)
VDD_3V3_SPEKTRUM: D102.C PSM200.SPEK SPKT100.3 | length 59
  Signal Layer 2 w0.8: v3@49.352,61.366 51.016,61.366 52.25,62.6 56.686,62.6 57.92,61.366 60.776,61.366 60.867,61.275 61.51,61.275 61.602,61.366 71.342,61.366 71.509,61.199 72.153,61.199 72.32,61.366 SPKT100.3@93.39,61.366 ; SPKT100.3@93.365,61.373 SPKT100.3@93.39,61.347
  Bottom Layer w0.15: SPKT100.3@93.39,61.347 93.424,61.314 D102.C@93.424,59.823
  Bottom Layer w0.8: 42.266,55.956 42.266,58.841 44.817,61.392 v3(49.454,61.392) ; PSM200.SPEK@42.3,54.636 PSM200.SPEK@42.3,55.65
VDD_3V3_SPEKTRUM_EN: P500.19 PSM200.VDD_3V3_SPEKTRUM_EN | length 16.2
  Top Layer w0.152: P500.19@66.954,44.526 66.954,43.663 v1(67.005,43.612)
  Bottom Layer w0.152: PSM200.VDD_3V3_SPEKTRUM_EN@54.958,45.442 56.165,44.235 56.165,43.226 56.536,42.854 59.832,42.854 60.061,42.625 60.437,42.625 60.814,43.002 61.112,43.002 61.612,42.503 61.695,42.503 61.847,42.655 62.52,42.655 62.556,42.691 62.878,42.691 62.986,42.799 63.181,42.799 63.449,43.067 63.449,43.093 63.529,43.173 63.529,43.317 63.795,43.582 64.012,43.582 64.012,43.825 64.277,44.09 64.653,44.09 64.722,44.021 66.545,44.021 66.954,43.612 v1(67.005,43.612)
VDD_5V_BACKUP: P202.1 P202.2 PSM200.VDD_5V_BACKUP | length 21
  Top Layer w0.8: v3(35.484,44.704) 36.268,44.704 37.998,42.974 37.998,40.005 37.176,39.183 37.176,32.524 38.928,30.772 P202.2@39.526,30.772 ; P202.2@40.25,30.455 40.342,30.362 P202.1@40.342,28.579
  Bottom Layer w0.8: PSM200.VDD_5V_BACKUP@35.433,43.205 PSM200.VDD_5V_BACKUP@35.433,45.212
VDD_5V_BRICK: P200.1 P200.2 PSM200.VDD_BRICK_IN | length 14.6
  Top Layer w0.8: v3@35.814,48.438 36.043,48.209 37.252,48.209 37.583,47.879 ; P200.1@40.292,44.907 38.666,46.533 38.666,46.796 37.583,47.879 ; P200.2@40.292,46.863 38.599,46.863 37.583,47.879
  Bottom Layer w0.8: 34.433,47.212 34.433,49.212 35.56,49.212 35.56,48.522 34.433,47.395
  other v3: 35.56,48.285
VDD_5V_HIPOWER: C601.P$1 C602.P$1 L101.P$1 PSM200.5V_HIPOWER U601.10 U601.11 U601.12 U601.13 | length 101.8
  Signal Layer 2 w0.3: v1(72.238,33.046) 73.323,33.046 73.88,32.489 73.88,32.241 73.971,32.15 74.191,32.15 74.229,32.112 74.666,32.112 74.704,32.15 75.677,32.15 76.82,33.293 78.543,33.293 v1(78.918,32.918)
  Signal Layer 2 w0.8: v3(50.267,52.299) 51.449,51.116 v3(76.683,51.116) ; v3@105.1,30.613 v3@105.151,30.563
  Signal Layer 1 w0.8: v3(76.683,51.116) 78.359,49.44 78.359,36.62 ; 78.359,36.627 79.223,35.763 79.223,32.918 82.753,29.388 84.328,29.388 85.7,30.759 88.646,30.759 90.373,29.032 91.719,29.032 93.802,26.949 102.007,26.949 v3(105.6,30.542)
  Bottom Layer w0.15: v1@72.238,32.969 v1(72.238,33.046) ; U601.13@99.211,29.011 99.211,28.654 99.436,28.429 101.061,28.429 101.315,28.683 C601.P$1@101.315,29.597
  Bottom Layer w0.8: v3(50.267,52.299) 50.267,52.426 50.276,52.435 PSM200.5V_HIPOWER@50.276,54.942 ; 99.936,30.05 104.638,30.05 v3@105.151,30.563 ; v3@105.549,30.593 105.549,35.1
VDD_5V_IN_PROT: P500.61 P500.63 PSM200.VDD_5V_IN_PROT | length 27.1
  Top Layer w0.15: P500.63@55.947,44.526 56.197,44.526 ; v3@56.197,46.304 56.032,46.468 56.032,46.33 56.388,45.974 v3@57.15,45.974
  Top Layer w0.8: 56.197,44.526 v3@56.197,46.304
  Signal Layer 1 w0.8: v3@50.317,30.759 50.317,34.138 49.617,34.838 49.617,44.46 51.41,46.253 51.689,45.974 56.464,45.974 v3(56.642,46.152)
  Bottom Layer w0.8: v3@50.276,30.963 PSM200.VDD_5V_IN_PROT@50.276,32.436
  other v3: 50.267,30.963
VDD_5V_PERIPH: L100.P$1 L102.P$1 L103.P$1 L104.P$1 L105.P$1 L106.P$1 L107.P$1 P105.1 P106.1 PSM200.5V_PERIPH | length 97.5
  Top Layer w0.254: v3@48.285,56.388 49.2,57.303 49.2,59.3 51.061,61.161 v1(52.661,61.161)
  Signal Layer 2 w1.6: 102.191,49.858 103.525,48.524 105.324,48.524 105.6,48.8 v3@105.6,50.8
  Signal Layer 2 w2: v3@48.285,56.388 50.613,54.061 59.841,54.061 60.059,53.843 61.42,53.843 61.939,54.361 65.459,54.361 65.927,53.893 67.068,53.893 67.174,54 70.671,54 71.286,54.615 80.335,54.615 82.722,52.229 89.054,52.229 89.562,52.737 96.771,52.737 97.919,53.885 99.193,53.885 99.645,53.433 100.303,53.433 102.191,51.545 102.191,49.858
  Bottom Layer w0.254: P105.1@52.661,60.5 v1(52.661,61.161) ; v1(82.669,53.416) 82.669,57.683 84.961,59.976
  Bottom Layer w0.8: PSM200.5V_PERIPH@48.275,54.942 v3@48.275,56.5 ; 105.587,37.8 105.587,51.98
  other v3: 105.803,50.761 48.26,56.413
VDD_SERVO: "P304.SERVO VCC" D300.ANODE P301.3 P500.53 | length 92.1
  Top Layer w0.254: P301.3@36.455,59.176 39.865,55.766 42.431,55.766 49.684,48.513 49.684,46.152 51.566,44.27 51.566,43.731 52.73,42.566 57.355,42.566 57.427,42.494 57.831,42.494 58.14,42.803 58.299,42.803 58.594,43.098 58.594,43.257 58.649,43.311 58.649,43.779 58.566,43.862 58.566,44.407 P500.53@58.447,44.526
  Bottom Layer w0.2: 28.557,26.518 28.557,26.732 29.775,27.95 31.95,27.95 33.382,26.518 D300.ANODE@41.037,26.518
  Bottom Layer w0.254: 28.413,26.662 28.413,45.72 ; 32.29,46.152 31.859,45.72 28.413,45.72 ; P301.3@36.059,59.741 35.728,59.411 35.728,59.039 35.11,58.42 29.356,58.42 28.413,59.363 28.413,45.72
  Bottom Layer w0.5: 28.413,26.662 28.557,26.518
VDD_SERVO_IN: L300.P$2 P500.9 PSM200.SERVO_IN | length 50.2
  Top Layer w0.254: v1(69.291,43.078) 69.291,43.155 69.469,43.332 P500.9@69.469,44.526
  Signal Layer 2 w0.254: v1(60.249,43.078) 61.138,42.189 66.142,42.189 67.06,43.108 67.214,43.108 67.231,43.125 69.244,43.125 v1(69.291,43.078)
  Signal Layer 1 w0.254: v1(42.647,27.559) 43.917,26.289 48.734,26.289 52.451,30.006 52.451,36.525 54.915,38.989 57.15,38.989 58.419,40.258 58.419,41.274 60.249,43.104 v1(60.249,43.078)
  Bottom Layer w0.254: L300.P$2@39.284,30.455 41.53,32.7 PSM200.SERVO_IN@42.6,32.7 ; PSM200.SERVO_IN@42.266,32.436 42.647,32.055 v1(42.647,27.559)
VSYS: P600.2 P600.4 P600.6 R607.P$2 R608.P$2 R609.P$1 R610.P$2 | length 35.6
  Top Layer w0.15: R610.P$2@69.492,34.2 69.527,34.2 70.162,33.565 70.162,33.53 70.855,32.837 71.303,32.837 72.568,31.572 75.844,31.572 v1(77.038,32.766)
  Signal Layer 2 w0.15: v1(62.916,30.328) 62.916,30.51 64.024,31.618 66.564,31.618 66.589,31.592 67.472,31.592 67.741,31.323 68.183,31.323 68.533,31.674 68.737,31.674 69.169,31.241 69.169,31.008 69.444,30.734 69.799,30.734 70.998,31.933 71.764,31.933 72.44,32.608 73.263,32.608 73.528,32.344 73.528,32.096 73.863,31.76 74.811,31.76 74.85,31.798 75.823,31.798 76.791,32.766 v1(77.038,32.766)
  Bottom Layer w0.15: R608.P$2@61.798,30.277 61.849,30.328 v1(62.916,30.328) R607.P$2@63.678,30.328 ; P600.6@75.213,36.932 P600.4@75.62,36.932 P600.2@76.001,36.932 ; R609.P$1@77.544,31.598 77.544,32.26
  Bottom Layer w1: P600.4@75.62,36.932 76.251,36.932 77.253,35.929 77.253,33.749 77.544,33.458 77.544,32.26
pads on no net: JP400.1 JP401.1 P500.26 P500.65 P500.hole-1 P500.hole-2 P600.14 P600.29 P600.38 P600.40 P600.49 PSM200.NC S600.A2 S600.B4 S601.A2 S601.B4 S602.A2 S602.B4 U601.4 U603.3 U603.5 U603.6 U603.7 U603.8 U603.9 U603.10 U603.11 U603.12 U603.13 U603.18 U603.23 U603.25 U603.27 U603.28 U603.29 U603.31 U603.32 USB600.GND5 USB600.GND6 USB600.ID USB601.GND5 USB601.GND6

## Polygon pours and split planes (outlines as drawn)
GND on Signal Layer 1 "Sig1_GND" (solid, remove dead copper, pour order 12): 20.327,65.3 107.5,65.3 108.6,64.2 109.9,62.9 109.9,22.7 20.046,22.7 20.046,35.408
GND on Signal Layer 2 "Sig_GND" (solid, remove dead copper, pour order 10): 22.1,65.2 22.7,65.8 110.1,65.8 110.1,23.9 109.7,23.5 109.2,23 19.5,23
GND on Top Layer "Top-GND" (solid, remove dead copper, pour order 13): 21.339,64.059 108.4,64.059 108.4,24.435 21.473,24.435
GND on Bottom Layer "Top Layer-No Net" (solid, pour order 7): 95.58,31.217 95.58,32.487 96.368,32.487 96.723,32.842 96.73,32.893 96.73,33.731 97.152,34.087 101.314,34.087 101.676,33.782 101.676,33.045 101.435,32.842 99.339,32.842 99.492,32.366 98.356,31.23 97.206,31.217
VDD_5V_HIPOWER on Bottom Layer "Top Layer-No Net" (solid, pour order 6): 104.5,28.949 100.004,28.949 99.623,29.33 99.623,30.981 100.9,30.969 101.757,31.768 102.036,32.353 104.365,32.353 104.5,32.251
GND on Bottom Layer "Top Layer-No Net" (solid, pour order 2): 104.014,26.354 104.014,28.276 98.496,28.276 98.441,28.336 98.414,28.366 98.414,30.858 97.567,30.858 97.567,30.257 97.512,30.257 97.457,30.197 97.676,29.957 97.676,26.444
4V38 on Bottom Layer "Top Layer-No Net" (solid, pour order 4): 97.2,28.2 97.2,26.355 97.272,26.285 97.224,26.238 90.693,26.238 90.693,27.546 90.931,27.78 96.199,27.78 96.199,28.247 96.175,28.27 96.199,28.247 97.176,28.247
NetL600_P$1 on Bottom Layer "Top Layer-No Net" (solid, pour order 5): 97.357,30.917 97.357,29.621 96.997,29.266 91.771,29.266 91.617,29.418 91.617,30.891 91.72,30.993 97.28,30.993
VDD_SERVO on Bottom Layer "Top-VDD_SERVO" (solid, remove dead copper, pour order 9): 32.8,55 35,57.2 38.5,57.2 38.5,61 36.1,61 34.8,59.7 34.8,58.6 31.3,58.6 28.9,61 24.7,61 24.638,25.3 50.3,25.421 50.3,28.184 32.8,28.2
GND on Bottom Layer "Bottom-GND" (solid, remove dead copper, pour order 11): 108.5,64.059 108.5,24.181 20.803,24.181 20.803,64.059

## Keep-outs
Keep-Out Layer:
  lines w0.1: 24.4,25.15 24.4,63.65 108,63.65 108,25.15 24.4,25.15

## Other copper
Top Layer:
  text "PCB Files shown for use as a template / Footprint for the Cube is Patented, please contact ProfiCNC if you wish to use this footprint for your design, the use of this footprint for customized carrier boards will be granted free of charge, but we appreciate the official request, and you will be given a licence number for this. /  / Please Add  / your company name /  a link to where your design can be found (not mandatory)a description as to what your board is for, and take the next available serial number. here on github, and we will respond there. /  / https://github.com/proficnc/The-Cube/blob/master/CB_REV_C_Altium/Carrier%20board%20footprint%20approval" at 34.874,70.942 h1.52

## Silkscreen, mask and mechanical layers (free items; w line width, h text height)
Top Overlay:
  lines w0.1: 81.15,29.388 81.15,59.385
  lines w0.254: 42.65,28.905 42.65,59.893 ; 89.3,26.57 89.35,26.57
  text "rx" at 37.821,63.119 h0.5
  text "s" at 26.6,63.1 h0.5
  text "+" at 29.2,63.1 h0.5
  text "tx" at 32.817,63.043 h0.5
  text "+ - s" at 93.2,62.8 h0.7
  text "-" at 40.742,62.027 h0.7
  text "-" at 32.2,62 h0.7
  text "USB" at 83.5,60.4 h0.7 r90
  text "Spkt" at 91.4,59.7 h0.7 r90
  text "s" at 32.842,59.436 h0.7
  text "+" at 82.2,59.4 h0.7
  text "-" at 40.767,59.36 h0.7
  text "-" at 32.1,59.3 h0.7
  text "S.Bus out" at 34.1,58.2 h0.7
  text "P" at 82.3,58.1 h0.7
  text "M" at 82.3,56.9 h0.7
  text "-" at 32.1,56.76 h0.7
  text "ASI" at 91.913,56.617 h0.7 r90
  text "1" at 40.6,56.5 h0.7
  text "-" at 82.2,55.7 h0.7
  text "+" at 90.6,55.6 h0.7
  text "CAN" at 100.45,55.199 h0.7 r90
  text "Bz" at 81.5,54.6 h0.7
  text "+" at 98.95,54.371 h0.7
  text "ADC" at 89.7,54.336 h0.7
  text "-" at 32.1,54.22 h0.7
  text "-" at 40.6,53.7 h0.7
  text "-" at 90.45,53.082 h0.7
  text "H 2" at 98.2,52.925 h0.7
  text "Led" at 81.7,52.2 h0.7
  text "L 2" at 98.2,51.725 h0.7
  text "-" at 32.1,51.68 h0.7
  text "V" at 41.7,50.7 h0.7
  text "-" at 98.95,50.471 h0.7
  text "-" at 32.1,49.14 h0.7
  text "I" at 41.7,48.7 h0.7
  text "I2C2" at 83.6,48.3 h0.7 r90
  text "Telem 1" at 91.4,47.7 h0.7 r90
  text "+" at 82,47.4 h0.7
  text "+" at 89.8,47.4 h0.7
  text "-" at 32.1,46.6 h0.7
  text "TX" at 89.6,46.1 h0.7
  text "SCL" at 81.45,46 h0.7
  text "+" at 40.6,45.8 h0.7
  text "CAN" at 100.45,45.674 h0.7 r90
  text "RX" at 89.6,44.9 h0.7
  text "+" at 98.95,44.846 h0.7
  text "SDA" at 81.45,44.7 h0.7
  text "-" at 32.1,44.06 h0.7
  text "CTS" at 89.6,43.7 h0.7
  text "-" at 82,43.5 h0.7
  text "H 1" at 98.2,43.4 h0.7
  text "RTS" at 89.7,42.4 h0.7
  text "L 1" at 98.2,42.2 h0.7
  text "-" at 32.1,41.52 h0.7
  text "-" at 89.9,41.1 h0.7
  text "-" at 98.95,40.946 h0.7
  text "2" at 40.6,40.1 h0.7
  text "-" at 32.1,38.98 h0.7
  text "GPS 1" at 83.463,38.375 h0.7 r90
  text "Type-A Connector" at 51.7,37.5 h0.7
  text "+" at 81.9,37.4 h0.7
  text "-" at 40.6,37.3 h0.7
  text "-" at 32.1,36.44 h0.7
  text "TX" at 81.15,36.1 h0.7
  text "GPS 2" at 91.95,35.758 h0.7 r90
  text "Telem 2" at 100.3,35.5 h0.7 r90
  text "+" at 98.3,34.817 h0.7
  text "RX" at 81.148,34.7 h0.7
  text "+" at 90.1,34.6 h0.7
  text "V" at 41.7,34.3 h0.7
  text "-" at 32.1,33.9 h0.7
  text "TX" at 98.1,33.517 h0.7
  text "TX" at 89.65,33.5 h0.7
  text "SCL" at 81.15,33.4 h0.7
  text "I" at 41.7,32.3 h0.7
  text "RX" at 89.748,32.3 h0.7
  text "RX" at 98.1,32.317 h0.7
  text "SDA" at 81.15,32.2 h0.7
  text "-" at 32.1,31.36 h0.7
  text "CTS" at 98.1,31.117 h0.7
  text "SFT" at 81.15,31 h0.7
  text "SCL" at 89.75,31 h0.7
  text "RTS" at 98.2,29.817 h0.7
  text "LED" at 81.15,29.8 h0.7
  text "SDA" at 89.75,29.7 h0.7
  text "+" at 40.6,29.4 h0.7
  text "-" at 32.1,28.82 h0.7
  text "-" at 98.4,28.517 h0.7
  text "-" at 82,28.5 h0.7
  text "-" at 90.2,28.3 h0.7
  text "I2C2" at 83.463,26.375 h0.7 r90
  text "I2C1" at 91.913,26.37 h0.7 r90
  text "-" at 32.1,26.28 h0.7
Bottom Overlay:
  circle w0.1: c76.911,29.388 r1.5
  circle w0.1: c46.914,59.385 r1.5
Mechanical 1:
  the board outline again, w0.1

## Text inside footprints (layer, text, board x,y; h text height)
BATT600: Mechanical 16 "6.8MM" at 98.78,38.303 h0.7 r270
P500: Top Overlay "Male" at 57.637,40.839 h1.97
PSM200: Bottom Overlay "IO and power PixHawk2" at 48.768,46.562 h0.7 r45; Bottom Overlay "POWER IN" at 38.608,44.832 h0.7 r90; Bottom Overlay "ALM" at 56.558,39.942 h0.7 r90; Bottom Overlay "VBUS" at 56.558,42.142 h0.7 r90; Bottom Overlay "P EN" at 56.558,43.942 h0.7 r90; Bottom Overlay "S EN" at 56.558,45.942 h0.7 r90; Bottom Overlay "P OC" at 56.558,47.942 h0.7 r90; Bottom Overlay "HP OC" at 56.558,50.542 h0.7 r90; Bottom Overlay "BUZZ" at 56.558,38.042 h0.7 r90; Bottom Overlay "GND" at 52.858,56.042 h0.7; Bottom Overlay "FMU_5V" at 51.258,30.942 h0.7; Bottom Overlay "A_OK" at 48.958,30.942 h0.7; Bottom Overlay "B_OK" at 46.958,30.942 h0.7; Bottom Overlay "U_OK" at 44.958,30.942 h0.7; Bottom Overlay "Servo_VIN" at 41.558,31.542 h0.7; Bottom Overlay "GND" at 52.858,30.942 h0.7; Bottom Overlay "5V HP" at 51.058,56.142 h0.7; Bottom Overlay "5v P" at 48.858,56.142 h0.7; Bottom Overlay "NC" at 44.558,56.135 h0.7; Bottom Overlay "5V RX" at 46.958,56.142 h0.7; Bottom Overlay "3v3 SPEK" at 41.558,55.442 h0.7; Bottom Overlay "IN_5V_USB" at 34.158,41.542 h0.7 r90; Bottom Overlay "IN_5V_B" at 34.158,45.442 h0.7 r90; Bottom Overlay "IN_5V_A" at 34.158,49.342 h0.7 r90; Bottom Overlay "3DR Part# PCA_0007" at 49.568,45.762 h0.7 r45